# Altium PCB ISP2454-LX_Libraries.PcbDoc
Units mm, origin at the board's own origin, x right, y up, seen from the top; angles counter-clockwise.
Board outline 47 x 42 mm, 4 copper layers (Top Layer, Mid-Layer 1, Mid-Layer 2, Bottom Layer), stack 1.04 mm thick; 1 components, 2 nets, 62 pads, 0 vias.
Unrouted connection lines stored in the file: 12.
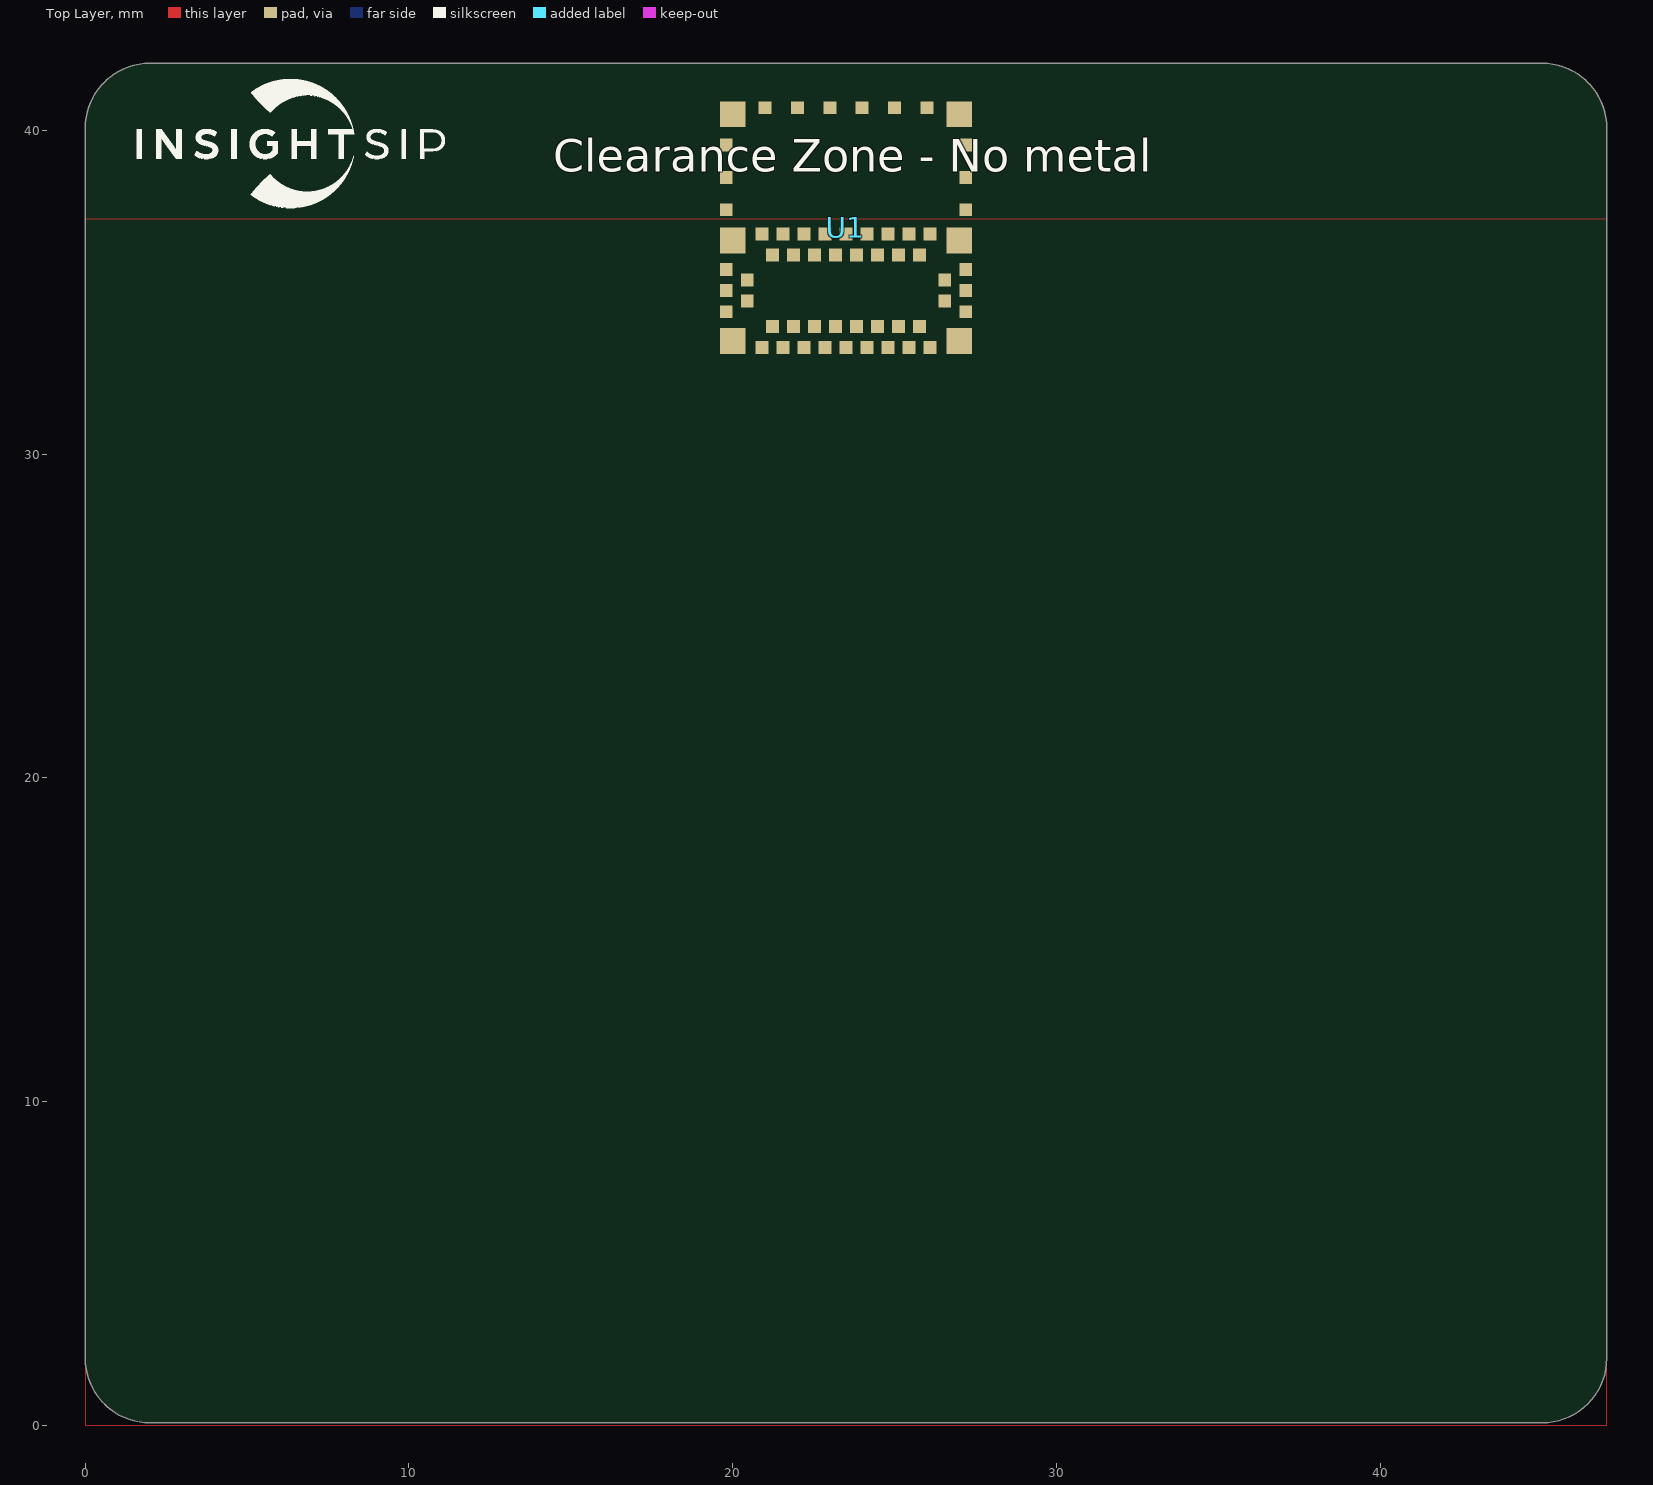
[diagram p0: Top Layer view]
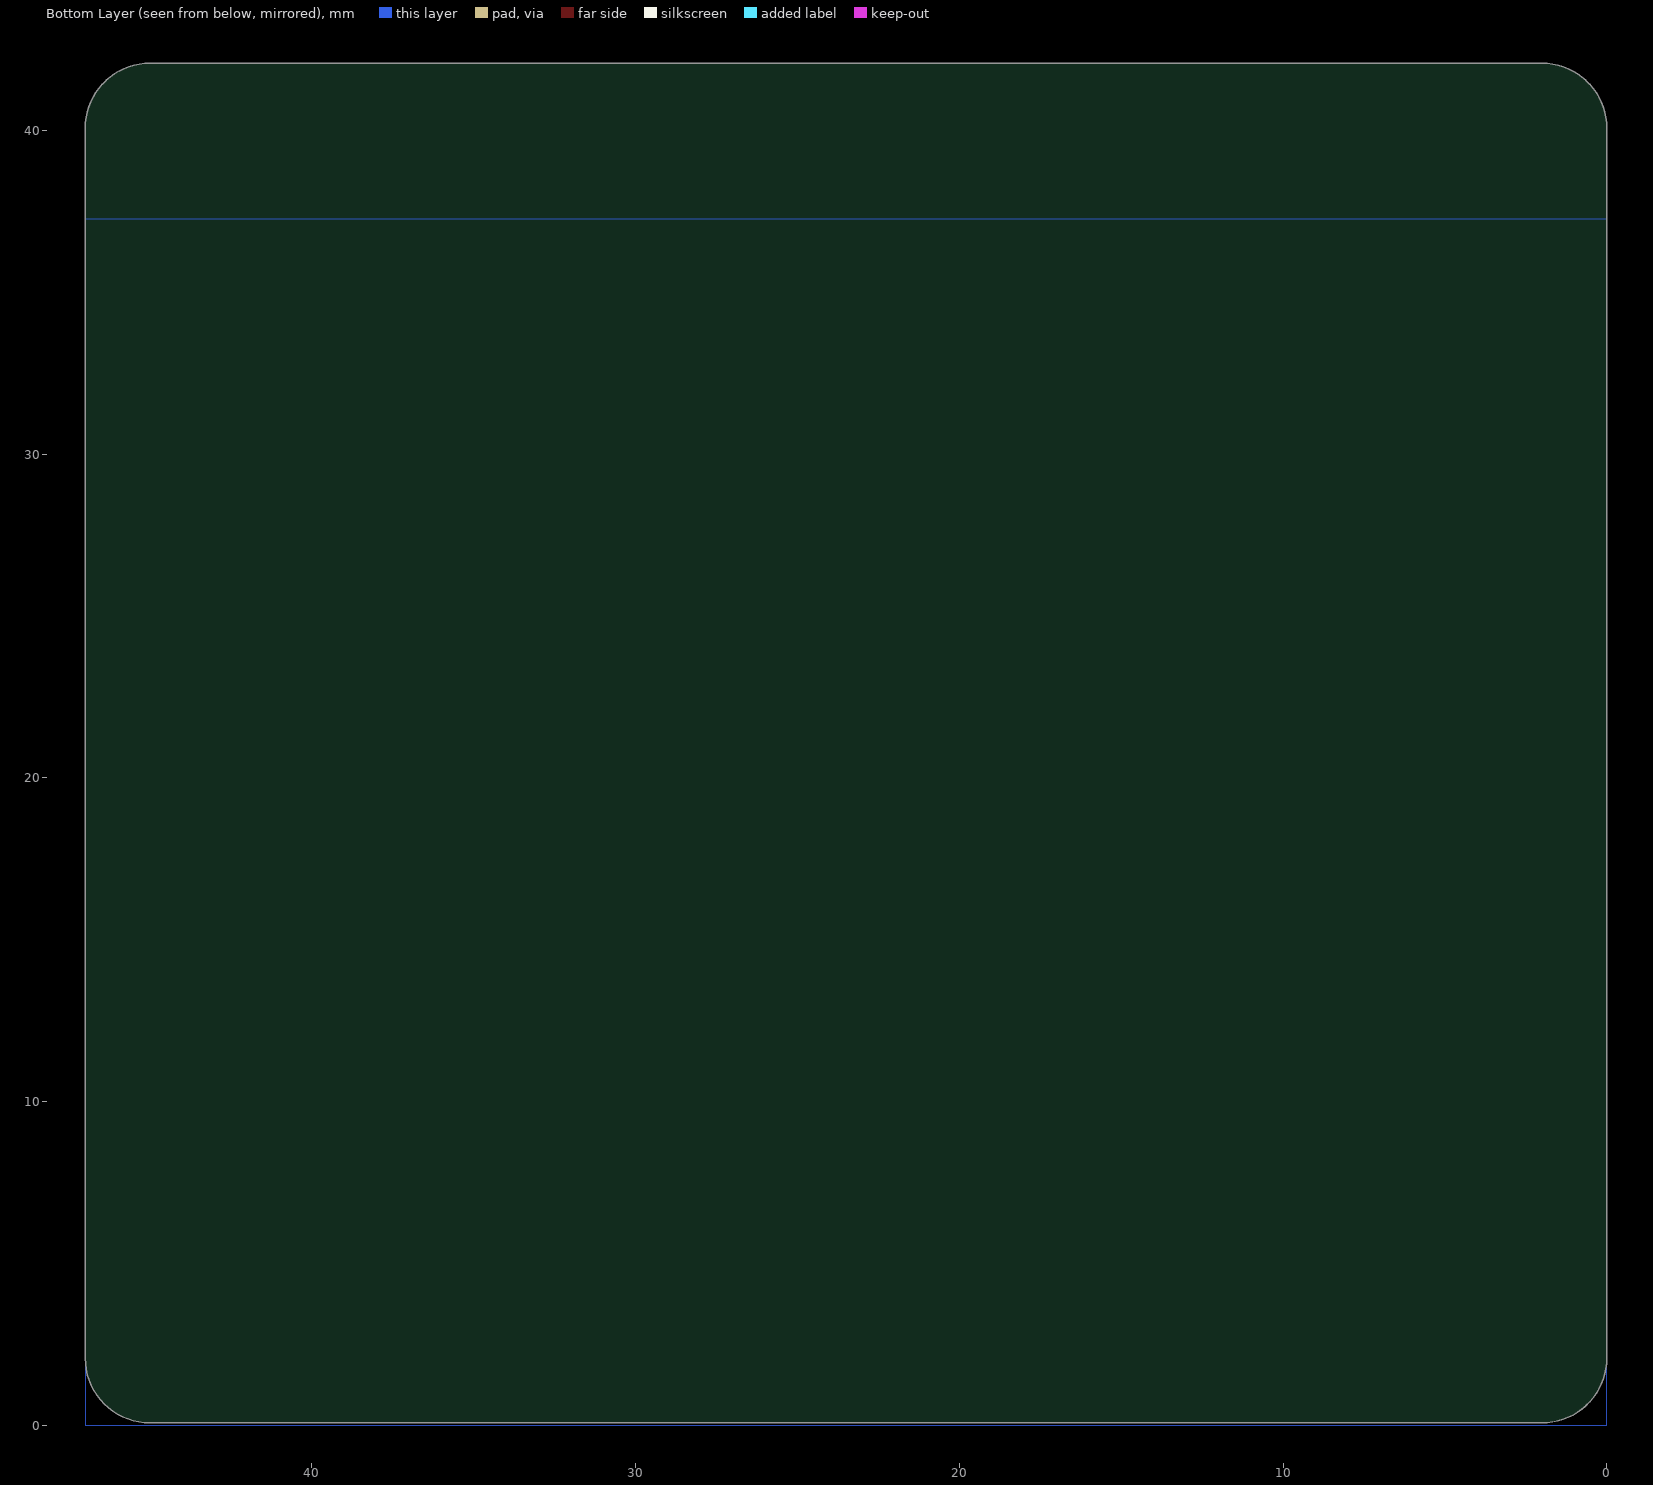
[diagram p1: Bottom Layer view, seen from below]
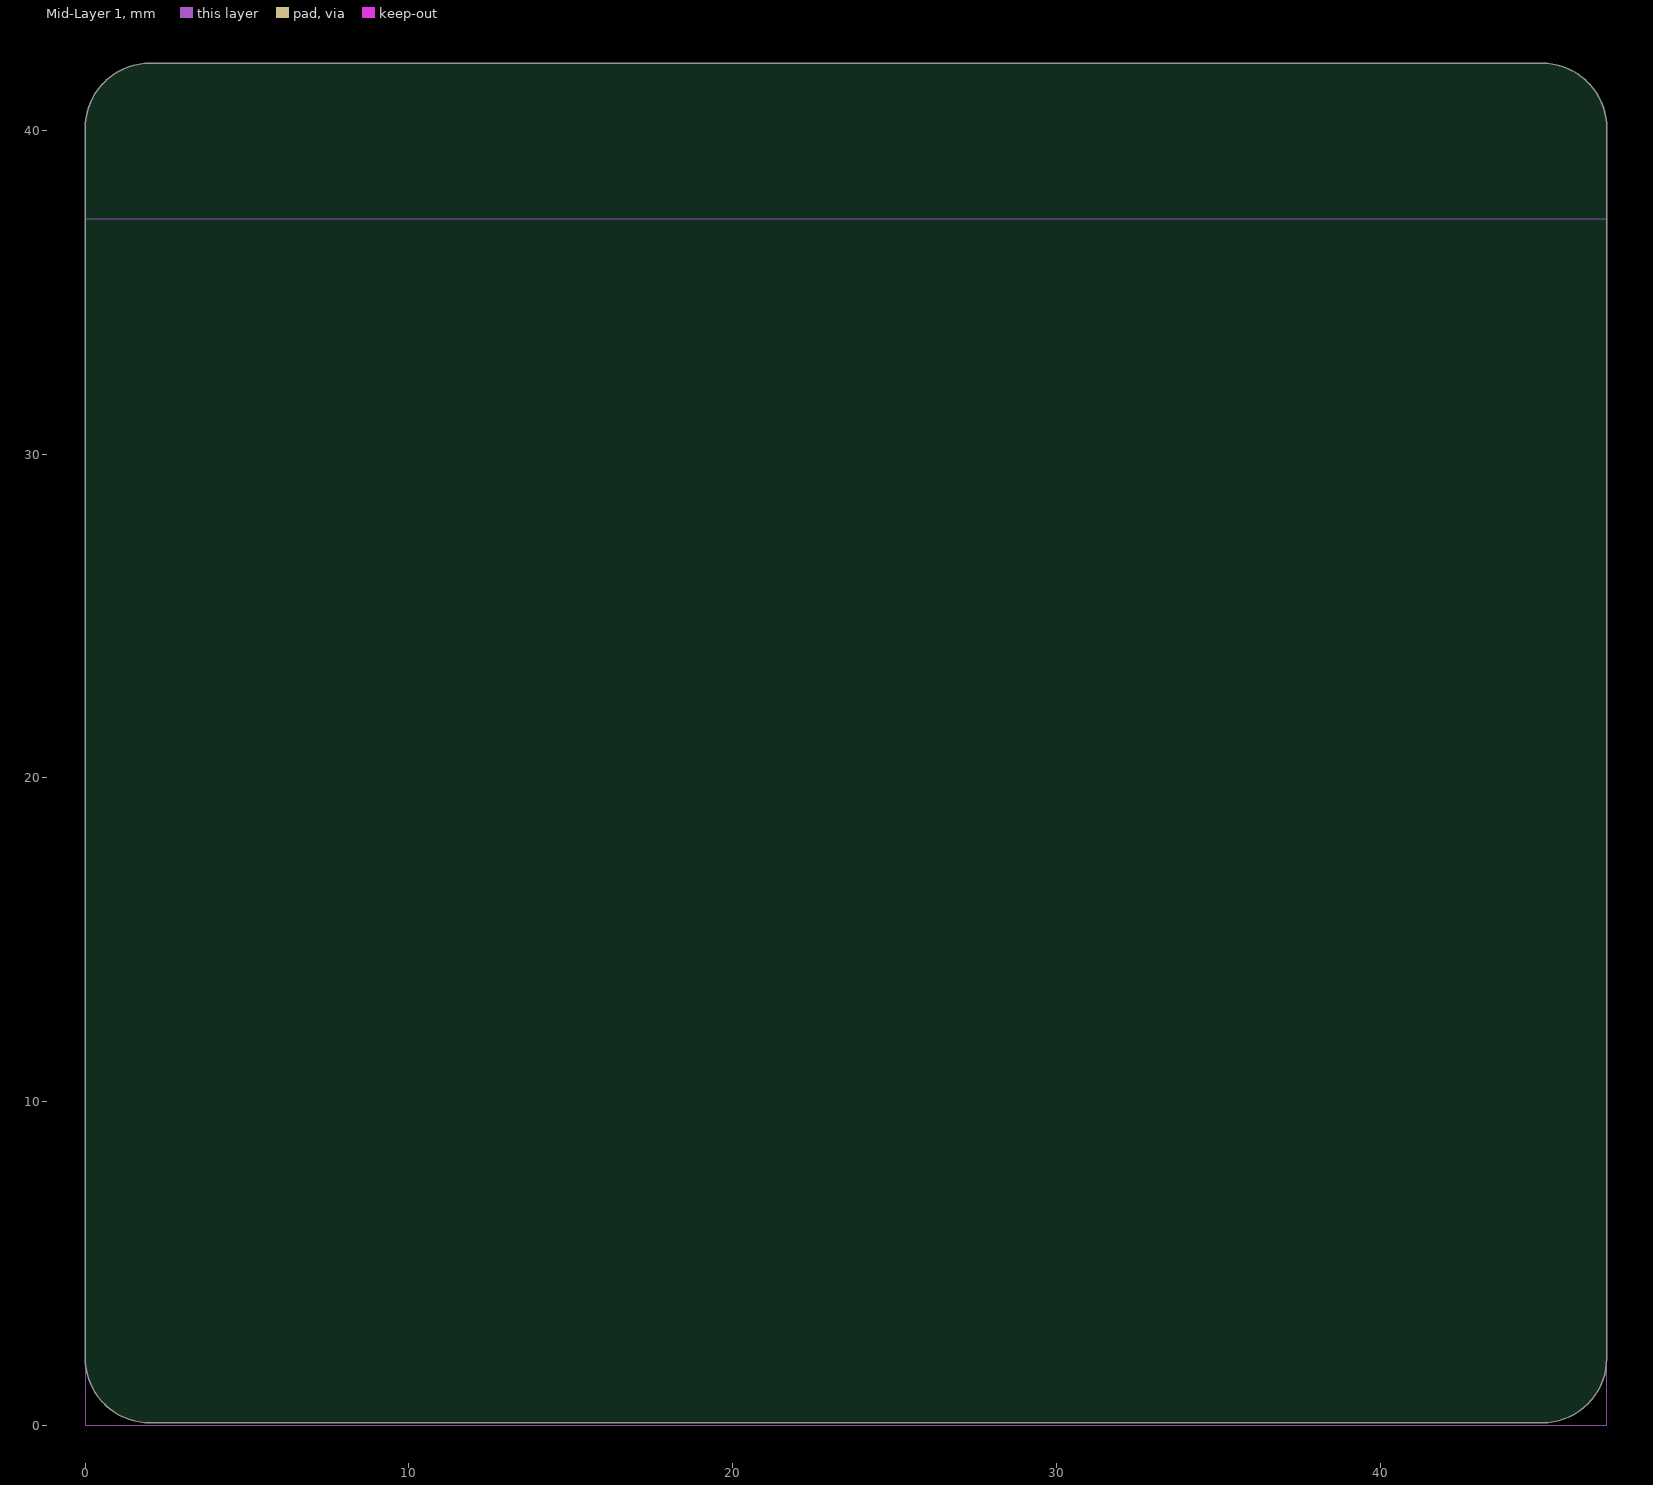
[diagram p2: Mid-Layer 1]
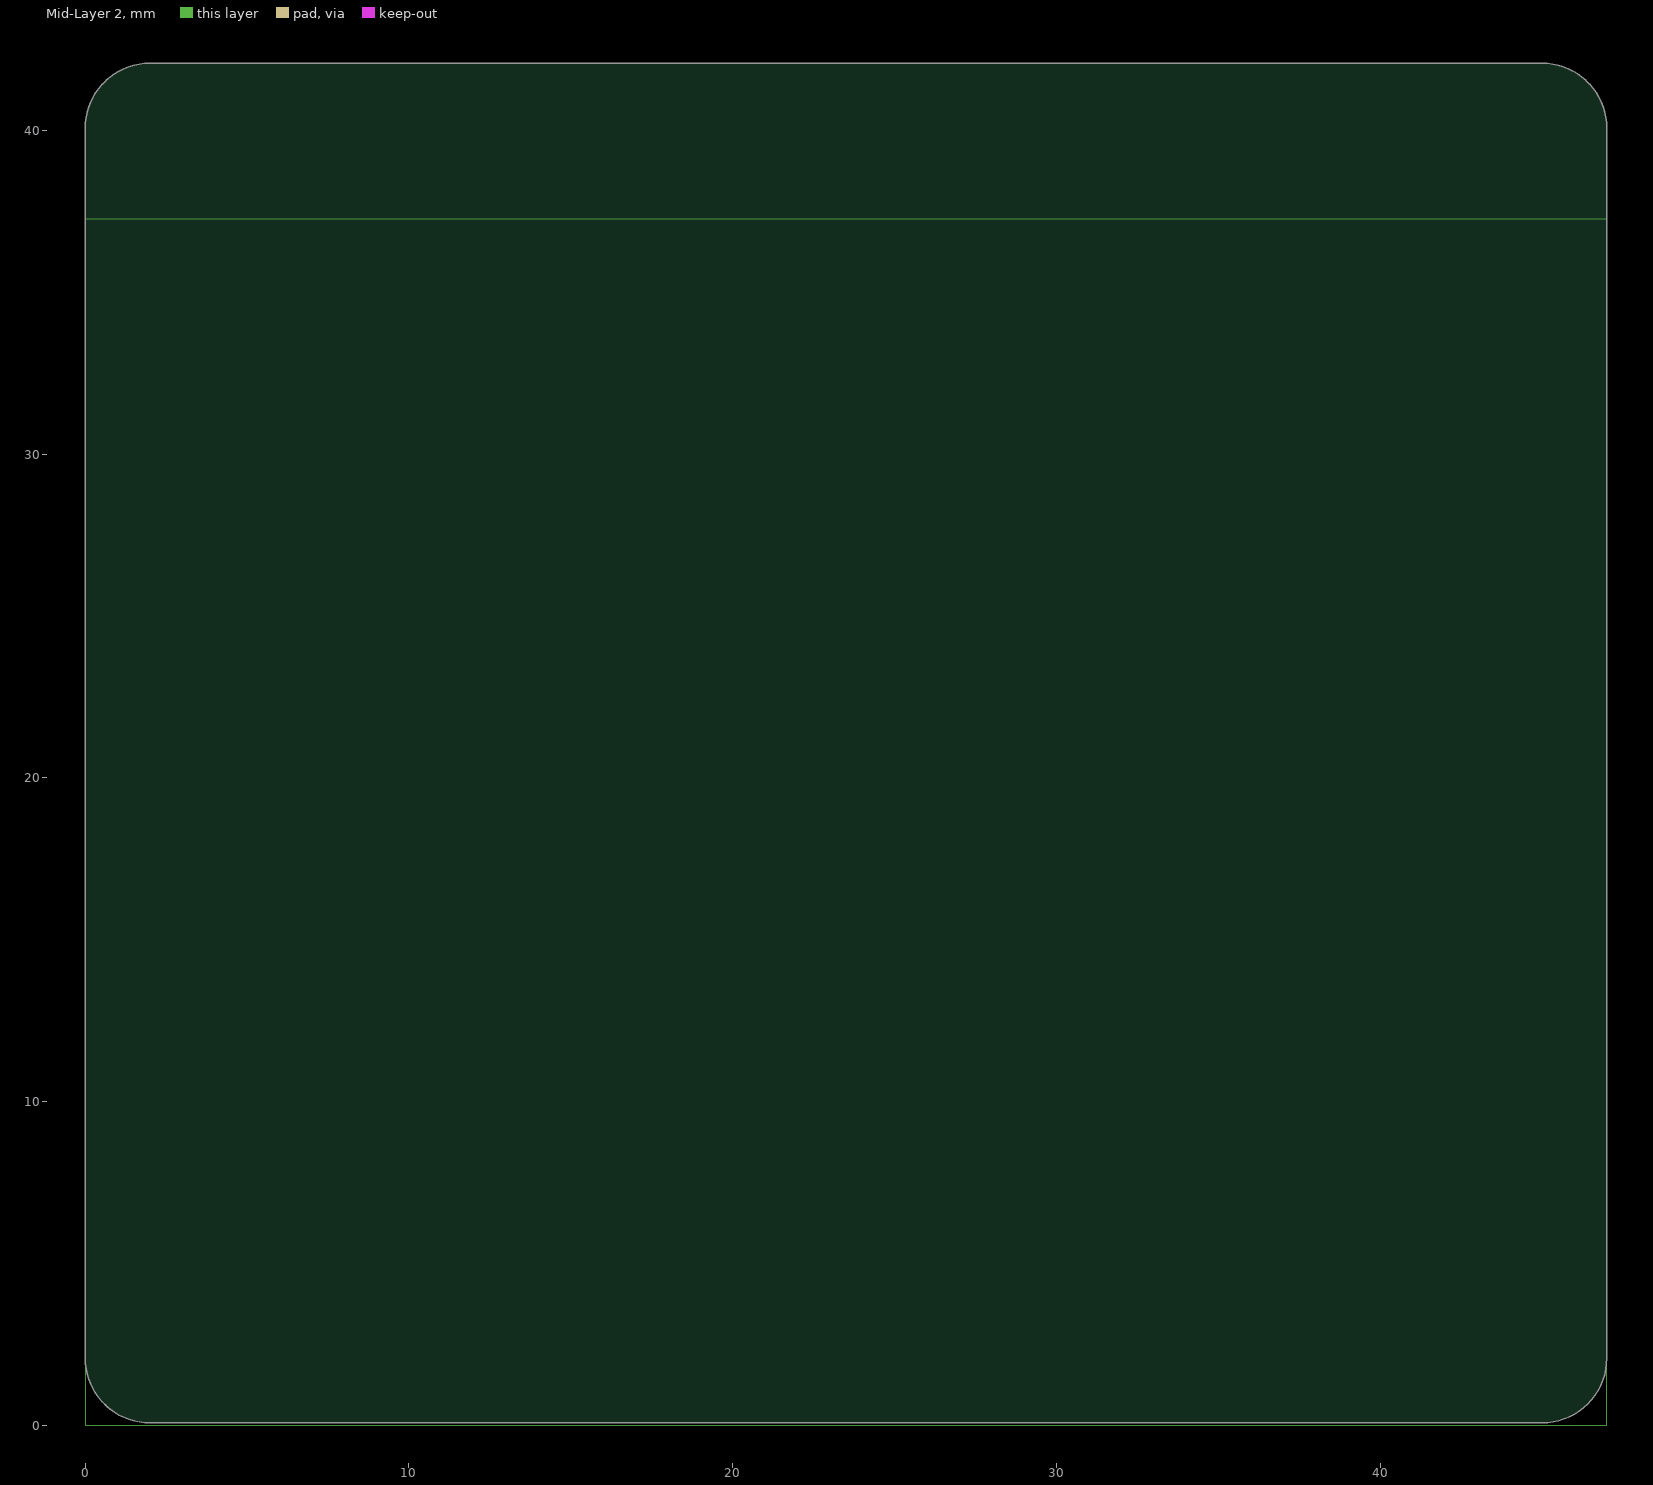
[diagram p3: Mid-Layer 2]

## Layer stack, top to bottom
Top Solder: solder mask 0.01, Solder Resist, Dk 3.5
Top Layer: signal copper 0.035
Dielectric 1: dielectric 0.2, FR-4, Dk 4.2
Mid-Layer 1: signal copper 0.035
Dielectric2: dielectric 0.5, FR-4, Dk 4.2
Mid-Layer 2: signal copper 0.035
Dielectric3: dielectric 0.2, FR-4, Dk 4.2
Bottom Layer: signal copper 0.035
Bottom Solder: solder mask 0.01, Solder Resist, Dk 3.5

## Board outline
2,0.075 cw(c2,2.075) 0,2.075 0,40.089 0,40.075 cw(c2,40.075) 2,42.075 45,42.075 cw(c45,40.075) 47,40.075 47,40.085 47,2.075 cw(c45,2.075) 45,0.075

## Design rules (kind name [scope] priority, off if disabled: settings)
BoardOutlineClearance BoardOutlineClearance_3 [OnLayer('Top Layer')] p1: gap=0.25 ignorepadtopadclearanceinfootprint=FALSE
BoardOutlineClearance BoardOutlineClearance_2 [OnLayer('Mid-Layer 2')] p2: gap=0.4 ignorepadtopadclearanceinfootprint=FALSE
BoardOutlineClearance BoardOutlineClearance_1 [OnLayer('Mid-Layer 1')] p3: gap=0.4 ignorepadtopadclearanceinfootprint=FALSE
BoardOutlineClearance [OnLayer('Bottom Layer')] p4: gap=0.25 ignorepadtopadclearanceinfootprint=FALSE
Clearance Clearance_1 [InNet('RF')] p1: gap=0.1 ignorepadtopadclearanceinfootprint=FALSE
Clearance [All] p2: gap=0.1 ignorepadtopadclearanceinfootprint=FALSE
HoleToHoleClearance [All] p1: gap=0.1 allowstackedmicrovias=TRUE
MinimumSolderMaskSliver [All] p1: minsoldermaskwidth=0.1
PlaneConnect [All] p1: pad.planeconnectstyle=Direct pad.reliefexpansion=0.508 pad.reliefentries=4 pad.reliefconductorwidth=0.254 pad.reliefairgap=0.254 via.planeconnectstyle=Relief via.reliefexpansion=0.508 via.reliefentries=4 via.reliefconductorwidth=0.254 via.reliefairgap=0.254
PolygonConnect [All] p1: thpad.connectstyle=Direct thpad.reliefconductorwidth=0.254 thpad.reliefentries=4 thpad.polygonreliefangle="90 Angle" thpad.airgapwidth=0.254 smdpad.connectstyle=Relief smdpad.reliefconductorwidth=0.254 smdpad.reliefentries=4 smdpad.polygonreliefangle="90 Angle" smdpad.airgapwidth=0.254 via.connectstyle=Direct via.reliefconductorwidth=0.254 via.reliefentries=4 via.polygonreliefangle="90 Angle" via.airgapwidth=0.254
RoutingVias [All] p1: holewidth=0.15 width=0.35 viastyle="Through Hole" minholewidth=0.1 minwidth=0.3 maxholewidth=0.15 maxwidth=0.35 useviatemplates=TRUE viatemplateguid#1={868FA694-6AC6-4A8E-BEB7-683CC6327776} viatemplatename#1=v45h10m0mx0
SilkToSilkClearance [All] p1: silktosilkclearance=0.15
SilkToSolderMaskClearance [IsPad] p1: minsilkscreentomaskgap=0.15 clearancetoexposedcopper=TRUE
SolderMaskExpansion [All] p1: expansion=0.05 istentingtop=FALSE
SupplyNets "Schematic Supply Nets_2" [InNet('GND')] p1: voltage=0.000
Width Width_1 [InNet('RF')] p1: maxlimit=0.362 minlimit=0.221 preferedwidth=0.362 toplayer_minwidth=0.362 midlayer1_maxwidth=0.221 midlayer1_prefwidth=0.221 midlayer2_maxwidth=0.221 midlayer2_prefwidth=0.221 bottomlayer_minwidth=0.362 impedanceprofiledriven=TRUE impedanceprofileid={A0528D98-65D7-4791-92D4-48BA99D545A2} impedanceprofilevalue=50.000000 minimp=50.000000 maximp=50.000000 favimp=50.000000
Width [not InNet('VDD_nRF') and not InNet('VDD_3V')] p2: maxlimit=0.4 minlimit=0.1 preferedwidth=0.15
25 further rules are at their usual default settings.

## Components (designator, comment, footprint, x,y, rotation, side; value= is the part's Value field where it differs from the comment)
U1 "ISP2454" ISP2454 23.5,37 r180 top

## Footprints (in the part's own frame and the unit in brackets; to place one, negate y for a bottom-side part, rotate by r counter-clockwise, add the part's x,y. Pads: shape width x height; smd on the part's side, far side on the other; paste and mask are expansions set on the pad)
ISP2454 [mm] "Footprint of ISP2454-LX"
  rect 0.8x0.8 smd mask+0.05: 1(-3.5,3.5) 7(-3.5,0.4) 25(3.5,0.4) 31(3.5,3.5) 52(-3.5,-3.5) 59(3.5,-3.5)
  rect 0.4x0.4 smd mask+0.05: 2(-3.7,2.6) 3(-3.05,2.275) 4(-3.7,1.95) 5(-3.05,1.625) 6(-3.7,1.3) 8(-2.6,0.2) 9(-2.275,0.85) 10(-1.95,0.2) 11(-1.625,0.85) 12(-1.3,0.2) 13(-0.975,0.85) 14(-0.65,0.2) 15(-0.325,0.85) 16(0,0.2) 17(0.325,0.85) 18(0.65,0.2) 19(0.975,0.85) 20(1.3,0.2) 21(1.625,0.85) 22(1.95,0.2) 23(2.275,0.85) 24(2.6,0.2) 26(3.7,1.3) 27(3.05,1.625) 28(3.7,1.95) 29(3.05,2.275) 30(3.7,2.6) 32(2.6,3.7) 33(2.275,3.05) 34(1.95,3.7) 35(1.625,3.05) 36(1.3,3.7) 37(0.975,3.05) 38(0.65,3.7) 39(0.325,3.05) 40(0,3.7) 41(-0.325,3.05) 42(-0.65,3.7) 43(-0.975,3.05) 44(-1.3,3.7) 45(-1.625,3.05) 46(-1.95,3.7) 47(-2.275,3.05) 48(-2.6,3.7) 49(-3.7,-0.55) 50(-3.7,-1.55) 51(-3.7,-2.55) 53(-2.5,-3.7) 54(-1.5,-3.7) 55(-0.5,-3.7) 56(0.5,-3.7) 57(1.5,-3.7) 58(2.5,-3.7) 60(3.7,-2.55) 61(3.7,-1.55) 62(3.7,-0.55)
  Top Layer pour cut-out: -4,-4 4,-4 4,4 -4,4
  body extent -4.01,-3.99 4.01,3.99, height 1.11

## Part data
U1: "ISP2454 ISP module BLE based on nRF54L15", Manufacturer="Insight SiP", Manufacturer PN=ISP2454-LX, Check Lib=OK, ISP PART=ISP2454, Status=Active

## Nets (pads, with @x,y where several pads share a name; then routed paths per layer and width w, separated by ;. In a path a pad name is that pad's centre, name@x,y a point inside that pad or via, vN(x,y) a via of type N, cw(c..) or ccw(c..) an arc to the next point about the centre after c; other vN are vias at no path point)
GND: U1.1 U1.7 U1.8 U1.12 U1.14 U1.16 U1.18 U1.21 U1.23 U1.24 U1.25 U1.31
MOD+ANT: U1.20 U1.22
pads on no net: U1.2 U1.3 U1.4 U1.5 U1.6 U1.9 U1.10 U1.11 U1.13 U1.15 U1.17 U1.19 U1.26 U1.27 U1.28 U1.29 U1.30 U1.32 U1.33 U1.34 U1.35 U1.36 U1.37 U1.38 U1.39 U1.40 U1.41 U1.42 U1.43 U1.44 U1.45 U1.46 U1.47 U1.48 U1.49 U1.50 U1.51 U1.52 U1.53 U1.54 U1.55 U1.56 U1.57 U1.58 U1.59 U1.60 U1.61 U1.62

## Polygon pours and split planes (outlines as drawn)
GND on Top Layer "GND" (solid, remove dead copper, shelved, pour order 0): 0,0 47,0 47,37.25 0,37.25
GND on Mid-Layer 1 "GND" (solid, remove dead copper, shelved, pour order 1): 0,0 47,0 47,37.25 0,37.25
GND on Mid-Layer 2 "GND" (solid, remove dead copper, shelved, pour order 2): 0,0 47,0 47,37.25 0,37.25
GND on Bottom Layer "GND" (solid, remove dead copper, shelved, pour order 3): 0,37.25 47,37.25 47,0 0,0

## Silkscreen, mask and mechanical layers (free items; w line width, h text height)
Top Overlay:
  drawing of 11 lines, arcs and shapes, not listed
  text "Clearance Zone - No metal" at 14.45,38.725 h1